# Altium PCB PCB.PcbDoc (part 4 of 8)
Units mm, origin at the board's own origin, x right, y up, seen from the top; angles counter-clockwise.
Board outline 78.8 x 69 mm, 12 copper layers (Top Layer, GND_12, uStrip1, GND_35, Clocks, GND_57, POWER, Slow_Ctrl, GND_810, uStrip2, GND_1012, Bottom Layer), stack 2.926 mm thick; 460 components, 314 nets, 1929 pads, 3409 vias.
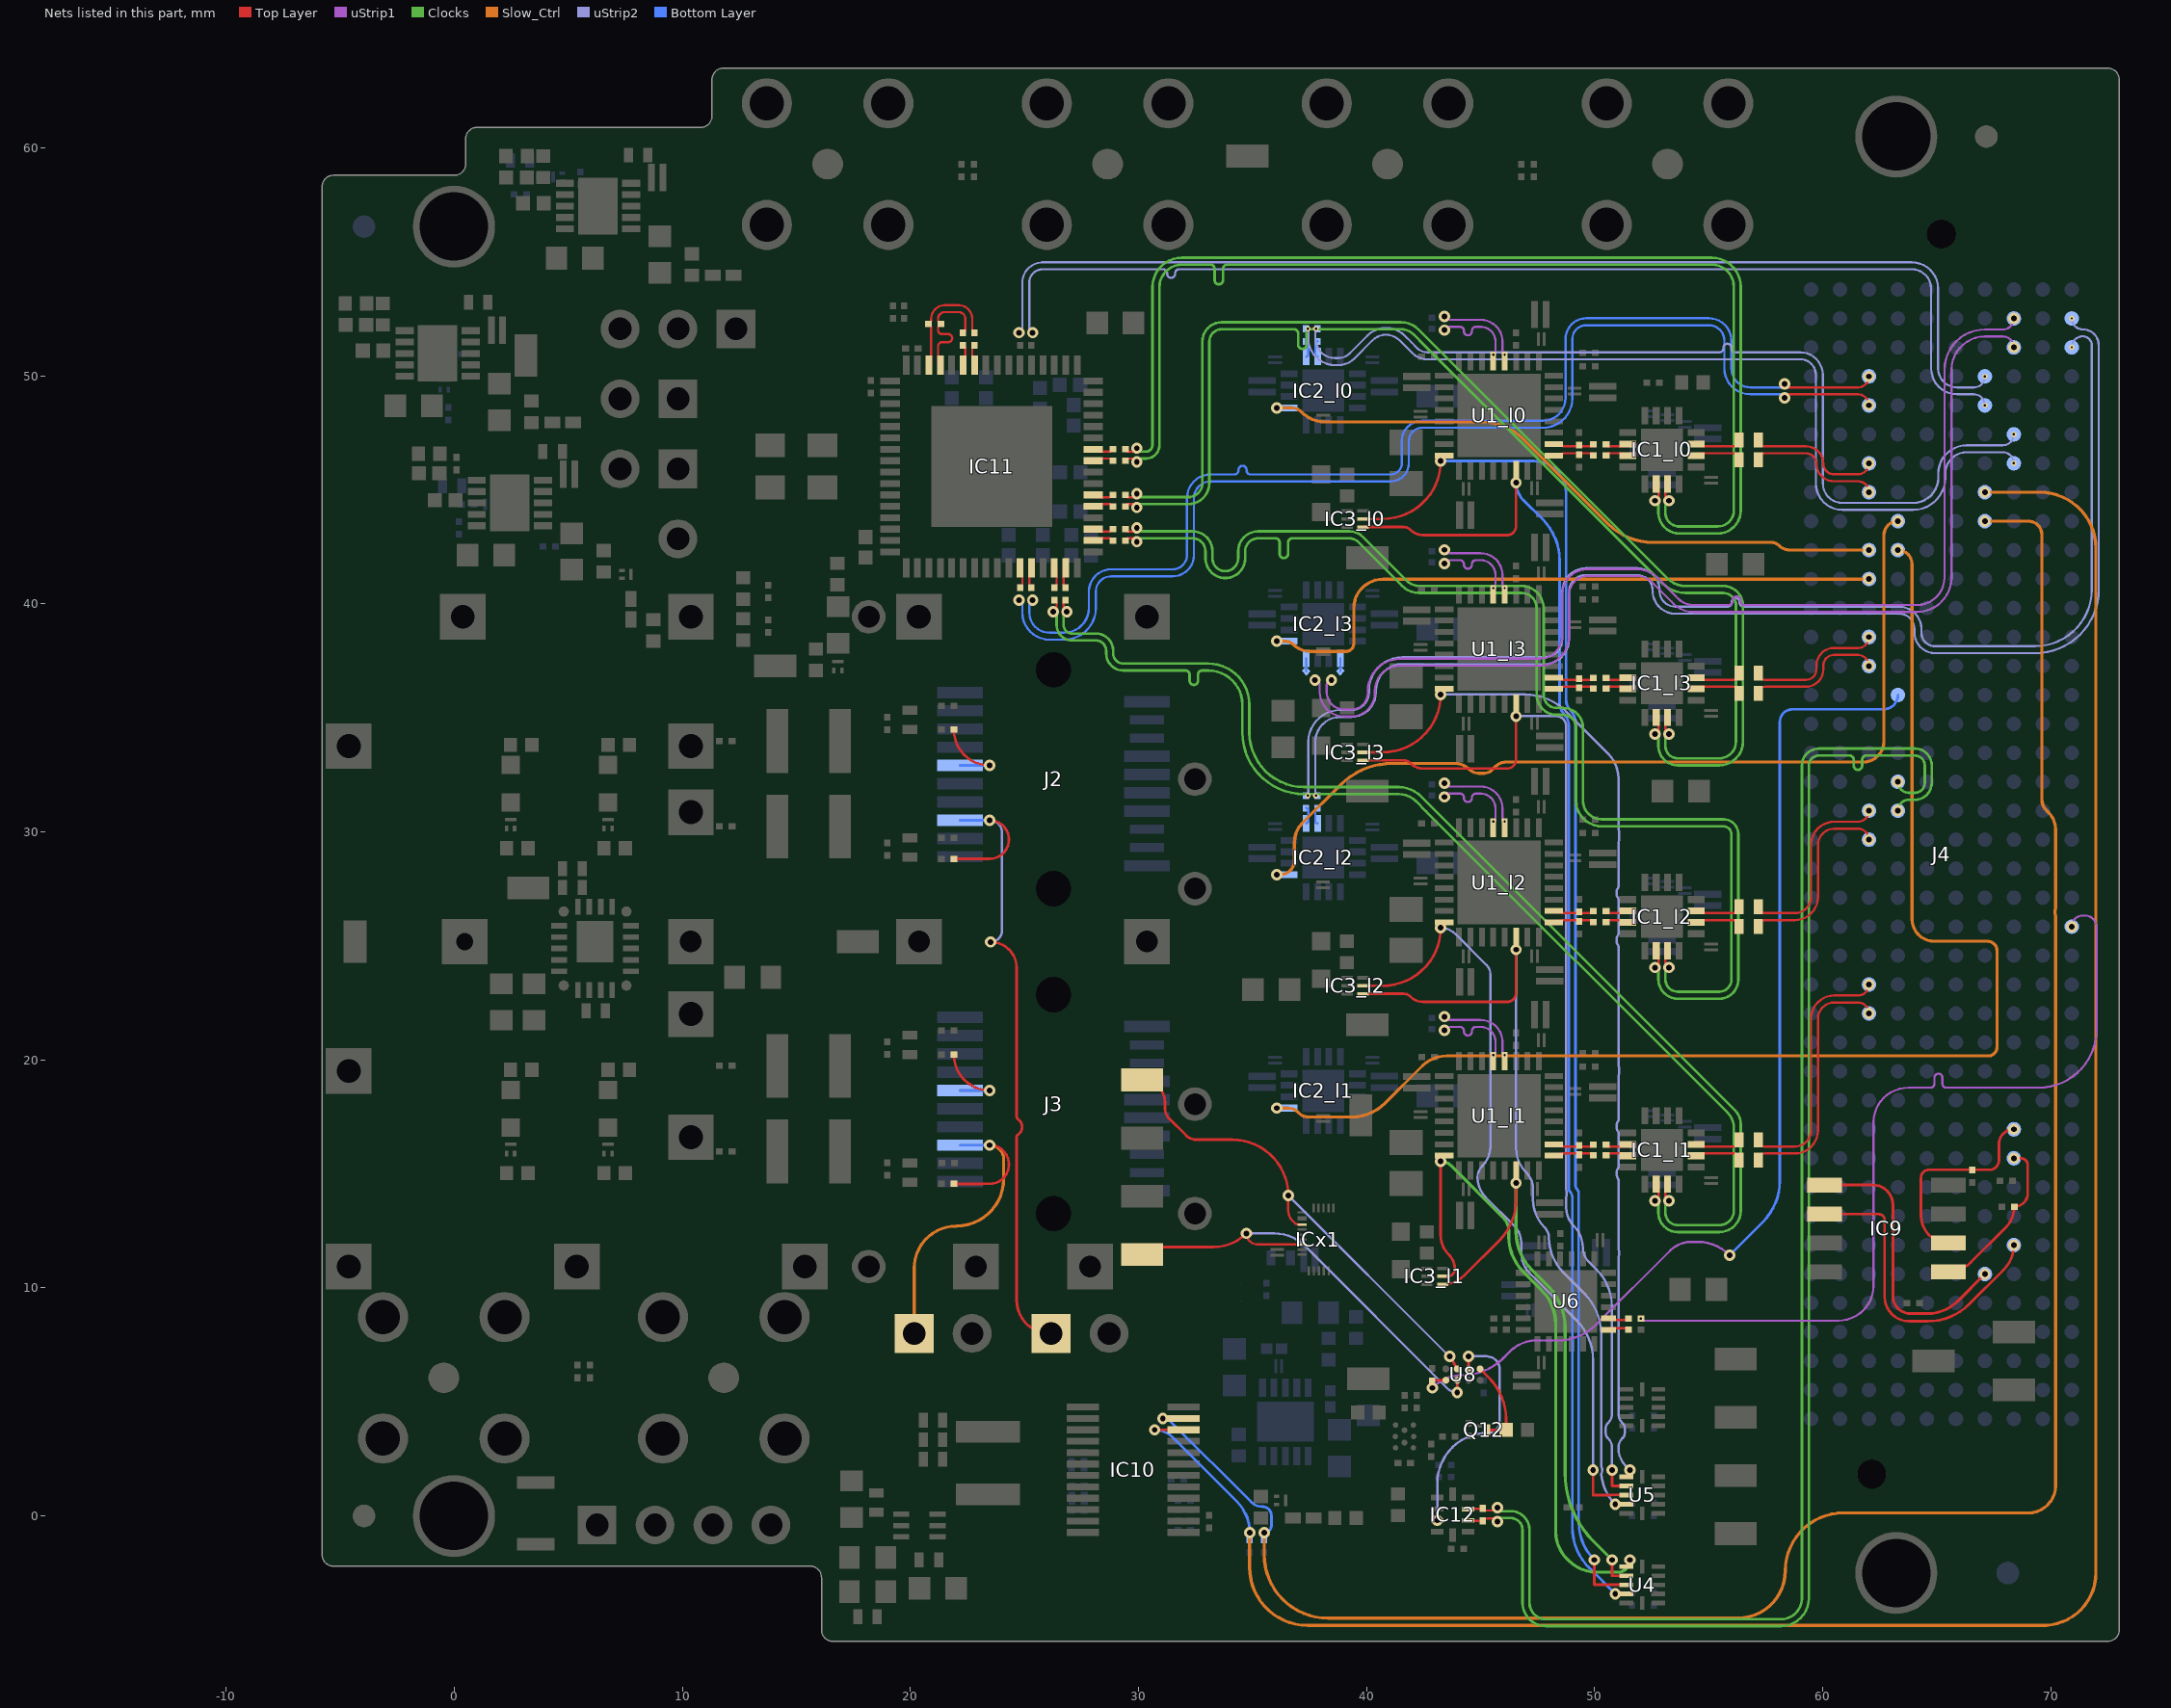
[diagram p13: the nets of this part, all layers, seen from the top]

## Via types
v1: diameter 0.25, hole 0.1, Top Layer to uStrip1, tented both sides, 1130 vias
v2: diameter 0.25, hole 0.1, uStrip2 to Bottom Layer, tented both sides, 686 vias
v3: diameter 0.5, hole 0.25, Top Layer to Bottom Layer, tented both sides, 674 vias
v4: diameter 0.5, hole 0.25, Top Layer to Bottom Layer, 632 vias
v5: diameter 0.5, hole 0.25, uStrip1 to uStrip2, tented both sides, 281 vias
v6: diameter 0.584, hole 0.483, Top Layer to Bottom Layer, tented both sides, 6 vias

## Nets (pads, with @x,y where several pads share a name; then routed paths per layer and width w, separated by ;. In a path a pad name is that pad's centre, name@x,y a point inside that pad or via, vN(x,y) a via of type N, cw(c..) or ccw(c..) an arc to the next point about the centre after c; other vN are vias at no path point) (continued)
*OE_SN74: Q12.3 R77.1 U8.1 | length 3.8
  Top Layer w0.117: U8.1@44.975,6.453 45.373,6.055 cw(c43.577,4.259) 46.117,4.259 R77.1@46.117,3.772 45.885,3.772 45.36,3.772 Q12.3@45.343,3.771
*RST_1V: ICx1.13 TP19.1 U8.3 | length 21.6
  Top Layer w0.102: v3(36.567,14.054) 36.567,13.381 ccw(c37.169,13.381) 36.749,12.95 36.863,12.839 ccw(c36.969,12.949) 36.954,12.797 37.112,12.782 ccw(c37.169,13.381) ICx1.13@37.169,12.779
  Top Layer w0.117: TP19.1@30.155,19.124 cw(c30.155,18.114) 31.166,18.114 31.166,17.859 ccw(c31.765,17.859) 31.341,17.436 32.087,16.69 ccw(c32.543,17.146) 32.543,16.502 34.119,16.502 cw(c34.119,14.054) v3(36.567,14.054) ; v3(43.651,7.005) U8.3@43.975,6.453
  uStrip2 w0.102: v3(36.567,14.054) 43.591,7.03 ccw(c43.651,7.091) v3(43.651,7.005)
*RST_PSF: J4.G15 R78.2 U8.5 | length 46.1
  Top Layer w0.117: R78.2@42.882,5.925 42.956,5.953 U8.5@43.475,5.953
  uStrip1 w0.102: v3(42.882,5.618) 42.912,5.648 cw(c44.184,4.376) 44.184,6.175 44.189,6.175 ccw(c44.189,8.715) 45.985,6.919 46.275,7.209 cw(c47.451,6.033) 47.451,7.696 48.365,7.696 ccw(c48.365,10.106) 50.07,8.402 53.307,11.639 cw(c54.235,10.712) 54.235,12.024 54.507,12.024 cw(c54.507,10.026) v3(55.919,11.438)
  Bottom Layer w0.117: v3(55.919,11.438) 57.373,12.892 ccw(c55.577,14.688) 58.117,14.688 58.117,34.821 cw(c58.679,34.821) 58.679,35.382 62.67,35.382 ccw(c62.67,36.01) J4.G15@63.298,36.01
ABS0: J2.6 R48.1 | length 3.8
  Top Layer w0.117: R48.1@21.904,34.487 21.904,34.482 ccw(c23.471,34.482) v3(23.471,32.915)
  Bottom Layer w0.117: J2.6@22.171,32.915 v3(23.471,32.915)
ABS1: J3.6 R56.1 | length 3.8
  Top Layer w0.117: R56.1@21.904,20.237 21.904,20.232 ccw(c23.471,20.232) v3(23.471,18.665)
  Bottom Layer w0.117: J3.6@22.171,18.665 v3(23.471,18.665)
ADJ_SCL: IC10.22 J4.D8 R63.1 | length 100.7
  Top Layer w0.117: v3@30.608,3.777 v3(30.708,3.777) IC10.22@31.978,3.777
  Slow_Ctrl w0.137: v3(34.881,-0.738) 34.872,-0.747 34.872,-2.258 ccw(c37.412,-2.258) 37.412,-4.798 69.673,-4.798 ccw(c69.673,-2.493) 69.808,-4.794 ccw(c69.673,-2.493) 71.978,-2.493 71.978,42.441 ccw(c69.52,42.441) 69.52,44.9 v3(67.108,44.9)
  Bottom Layer w0.117: v3(30.708,3.777) cw(c30.708,2.653) 31.503,3.448 34.31,0.641 cw(c32.932,-0.738) v3(34.881,-0.738) 34.876,-0.742 34.876,-1.039 R63.1@34.872,-1.044
ADJ_SDA: IC10.23 J4.D9 R62.1 | length 92.8
  Slow_Ctrl w0.137: v3@35.507,-0.732 35.507,-1.686 ccw(c38.301,-1.686) 38.301,-4.48 56.285,-4.48 ccw(c56.285,-2.407) 58.357,-2.407 cw(c60.897,-2.407) 60.897,0.133 69.01,0.133 ccw(c69.01,1.334) 70.211,1.334 70.211,26.3 ccw(c70.074,26.3) 70.203,26.347 cw(c70.599,26.488) 70.203,26.63 ccw(c70.074,26.676) 70.211,26.676 70.211,30.089 ccw(c69.117,30.089) 70.107,30.555 ccw(c69.117,30.089) 69.891,30.863 69.809,30.945 cw(c70.299,31.434) 69.607,31.434 69.607,43.034 ccw(c69.01,43.034) 69.01,43.63 v3(67.108,43.63)
  Bottom Layer w0.117: v3(31.065,4.277) cw(c31.065,3.771) 31.327,4.204 cw(c31.065,3.771) 31.422,4.129 34.935,0.616 ccw(c35.434,1.114) 35.434,0.409 cw(c35.434,0.015) 35.828,0.015 35.828,-0.411 cw(c35.508,-0.411) v3(35.508,-0.731)
BEAT_0_N: C24_l0.1 J4.H8 | length 6
  Top Layer w0.099: C24_l0.1@57.181,46.321 cw(c57.467,46.321) 57.467,46.607 59.264,46.607 cw(c59.264,46.147) 59.724,46.147 ccw(c60.489,46.147) 60.489,45.383 61.545,45.383 cw(c61.545,44.9) v3(62.028,44.9)
BEAT_0_P: C12_l0.1 J4.H7 | length 6
  Top Layer w0.099: C12_l0.1@57.181,47.198 ccw(c57.467,47.198) 57.467,46.912 59.264,46.912 cw(c59.264,46.147) 60.029,46.147 ccw(c60.489,46.147) 60.489,45.687 61.545,45.687 ccw(c61.545,46.17) v3(62.028,46.17)
BEAT_1_N: C24_l1.1 J4.H26 | length 11.2
  Top Layer w0.099: C24_l1.1@57.181,15.612 cw(c57.467,15.612) 57.467,15.898 58.775,15.898 ccw(c58.775,16.915) 59.793,16.915 59.793,21.81 cw(c60.506,21.81) 60.506,22.523 61.545,22.523 cw(c61.545,22.04) v3(62.028,22.04)
BEAT_1_P: C12_l1.1 J4.H25 | length 11.2
  Top Layer w0.099: C12_l1.1@57.181,16.488 ccw(c57.467,16.488) 57.467,16.202 58.775,16.202 ccw(c58.775,16.915) 59.488,16.915 59.488,21.81 cw(c60.506,21.81) 60.506,22.827 61.545,22.827 ccw(c61.545,23.31) v3(62.028,23.31)
BEAT_2_N: C24_l2.1 J4.H20 | length 8.6
  Top Layer w0.099: C24_l2.1@57.181,25.848 cw(c57.467,25.848) 57.467,26.134 58.775,26.134 ccw(c58.775,27.152) 59.793,27.152 59.793,29.43 cw(c60.506,29.43) 60.506,30.143 61.545,30.143 cw(c61.545,29.66) v3(62.028,29.66)
BEAT_2_P: C12_l2.1 J4.H19 | length 8.6
  Top Layer w0.099: C12_l2.1@57.181,26.725 ccw(c57.467,26.725) 57.467,26.439 58.775,26.439 ccw(c58.775,27.152) 59.488,27.152 59.488,29.43 cw(c60.506,29.43) 60.506,30.447 61.545,30.447 ccw(c61.545,30.93) v3(62.028,30.93)
BEAT_3_N: C24_l3.1 J4.H14 | length 6.2
  Top Layer w0.099: C24_l3.1@57.181,36.085 cw(c57.467,36.085) 57.467,36.37 59.264,36.37 ccw(c59.264,37.135) 60.029,37.135 60.029,37.303 cw(c60.489,37.303) 60.489,37.763 61.545,37.763 cw(c61.545,37.28) v3(62.028,37.28)
BEAT_3_P: C12_l3.1 J4.H13 | length 6.2
  Top Layer w0.099: C12_l3.1@57.181,36.961 ccw(c57.467,36.961) 57.467,36.675 59.264,36.675 ccw(c59.264,37.135) 59.724,37.135 59.724,37.303 cw(c60.489,37.303) 60.489,38.067 61.545,38.067 ccw(c61.545,38.55) v3(62.028,38.55)
BEAT_l0_N: C24_l0.2 IC1_l0.10 | length 2.1
  Top Layer w0.099: IC1_l0.10@54.449,46.509 cw(c54.685,46.274) 54.685,46.607 56.122,46.607 ccw(c56.147,46.632) 56.147,46.597 cw(c56.147,46.517) 56.204,46.573 56.243,46.534 cw(c56.029,46.321) C24_l0.2@56.331,46.321
BEAT_l0_P: C12_l0.2 IC1_l0.11 | length 2.1
  Top Layer w0.099: IC1_l0.11@54.449,47.009 ccw(c54.685,47.245) 54.685,46.912 56.108,46.912 ccw(c56.108,46.947) 56.133,46.922 56.147,46.922 ccw(c56.147,47.002) 56.204,46.945 56.243,46.984 ccw(c56.029,47.198) C12_l0.2@56.331,47.198
BEAT_l1_N: C24_l1.2 IC1_l1.10 | length 2.1
  Top Layer w0.099: IC1_l1.10@54.449,15.8 cw(c54.685,15.564) 54.685,15.898 56.122,15.898 ccw(c56.147,15.923) 56.147,15.887 cw(c56.147,15.808) 56.204,15.864 56.243,15.825 cw(c56.029,15.612) C24_l1.2@56.331,15.612
BEAT_l1_P: C12_l1.2 IC1_l1.11 | length 2.1
  Top Layer w0.099: IC1_l1.11@54.449,16.3 ccw(c54.685,16.536) 54.685,16.202 56.108,16.202 ccw(c56.108,16.238) 56.133,16.213 56.147,16.213 ccw(c56.147,16.293) C12_l1.2@56.204,16.236 ; C12_l1.2@56.204,16.236 56.243,16.275 ccw(c56.029,16.488) C12_l1.2@56.331,16.488
BEAT_l2_N: C24_l2.2 IC1_l2.10 | length 2.1
  Top Layer w0.099: IC1_l2.10@54.449,26.036 cw(c54.685,25.801) 54.685,26.134 56.122,26.134 ccw(c56.147,26.159) 56.147,26.124 cw(c56.147,26.044) 56.204,26.1 56.243,26.062 cw(c56.029,25.848) C24_l2.2@56.331,25.848
BEAT_l2_P: C12_l2.2 IC1_l2.11 | length 2.1
  Top Layer w0.099: IC1_l2.11@54.449,26.536 ccw(c54.685,26.772) 54.685,26.439 56.108,26.439 ccw(c56.108,26.474) 56.133,26.449 56.147,26.449 ccw(c56.147,26.529) 56.204,26.473 56.243,26.511 ccw(c56.029,26.725) C12_l2.2@56.331,26.725
BEAT_l3_N: C24_l3.2 IC1_l3.10 | length 2.1
  Top Layer w0.099: IC1_l3.10@54.449,36.273 cw(c54.685,36.037) 54.685,36.37 56.122,36.37 ccw(c56.147,36.395) 56.147,36.36 cw(c56.147,36.28) 56.204,36.337 56.243,36.298 cw(c56.029,36.085) C24_l3.2@56.331,36.085
BEAT_l3_P: C12_l3.2 IC1_l3.11 | length 2.1
  Top Layer w0.099: IC1_l3.11@54.449,36.773 ccw(c54.685,37.009) 54.685,36.675 56.108,36.675 ccw(c56.108,36.711) 56.133,36.686 56.147,36.686 ccw(c56.147,36.765) 56.204,36.709 56.243,36.748 ccw(c56.029,36.961) C12_l3.2@56.331,36.961
CDR_LOL_0: IC3_l0.2 U1_l0.16 U4.9 | length 60.8
  Top Layer w0.117: IC3_l0.2@39.84,43.726 39.844,43.73 40.711,43.73 ccw(c40.711,46.266) v3(43.247,46.266) ; v3(49.986,-1.924) 49.986,-3.019 50.721,-3.019 50.731,-3.009 51.379,-3.009 U4.9@51.389,-3.019
  Bottom Layer w0.117: v3(43.247,46.266) 47.333,46.266 cw(c47.333,44.85) 48.749,44.85 48.749,35.794 ccw(c49.432,35.794) 48.949,35.311 cw(c48.43,34.792) 49.164,34.792 49.164,14.462 ccw(c49.3,14.462) 49.204,14.366 cw(c48.97,14.132) 49.301,14.132 49.301,-0.27 ccw(c51.641,-0.27) v3(49.986,-1.924)
CDR_LOL_1: IC3_l1.2 U1_l1.16 U4.7 | length 28.4
  Top Layer w0.117: v3(43.247,15.557) 43.247,12.331 ccw(c44.491,12.331) 43.611,11.451 cw(c42.995,10.835) 43.866,10.835 43.866,10.815 cw(c43.563,10.815) 43.563,10.512 IC3_l1.2@43.34,10.512
  Clocks w0.137: v3(43.247,15.557) cw(c43.247,14.92) 43.501,15.504 cw(c43.247,14.92) 43.697,15.371 46.005,13.062 cw(c45.453,12.511) 46.234,12.511 46.234,12.26 ccw(c48.452,12.26) 46.883,10.691 47.679,9.896 cw(c46.195,8.412) 48.293,8.412 48.293,-0.685 ccw(c50.002,-0.685) 48.849,-1.946 ccw(c50.11,-0.681) 50.11,-2.467 51.002,-2.467 ccw(c51.002,-1.924) v3(51.545,-1.924)
CDR_LOL_2: IC3_l2.2 U1_l2.16 U5.9 | length 34.3
  Top Layer w0.117: IC3_l2.2@39.84,23.253 39.844,23.257 40.711,23.257 ccw(c40.711,25.793) v3(43.247,25.793) ; v3(49.93,2.012) 49.93,0.918 50.721,0.918 50.731,0.928 51.379,0.928 U5.9@51.389,0.918
  uStrip2 w0.102: v3(43.247,25.793) cw(c43.247,24.872) 43.898,25.523 45.263,24.159 cw(c44.866,23.762) 45.427,23.762 45.427,16.204 cw(c44.207,16.204) 45.07,15.341 ccw(c45.569,14.842) 44.863,14.842 ccw(c46.076,14.842) 45.218,13.984 46.483,12.719 cw(c45.764,12) 46.781,12 46.781,11.543 ccw(c48.052,11.543) 47.153,10.644 49.186,8.611 cw(c47.39,6.815) 49.93,6.815 v3(49.93,2.012)
CDR_LOL_3: IC3_l3.2 U1_l3.16 U5.7 | length 45.1
  Top Layer w0.117: IC3_l3.2@39.84,33.49 39.844,33.494 40.711,33.494 ccw(c40.711,36.03) v3(43.247,36.03)
  uStrip2 w0.102: v3(43.247,36.03) 46.947,36.03 cw(c46.947,33.49) 48.743,35.286 50.58,33.449 cw(c49.46,32.329) 51.044,32.329 51.044,30.417 51.075,29.718 cw(c50.673,29.698) 51.069,29.63 cw(c50.673,29.698) 51.05,29.558 ccw(c51.146,29.523) 51.044,29.524 51.044,27.622 cw(c50.907,27.623) 51.023,27.55 ccw(c51.378,27.324) 51.023,27.099 cw(c50.907,27.026) 51.044,27.027 51.044,25.555 cw(c50.907,25.555) 51.023,25.483 ccw(c51.378,25.257) 51.023,25.032 cw(c50.907,24.959) 51.044,24.96 51.044,19.887 51.074,19.493 cw(c50.673,19.462) 51.069,19.393 cw(c50.673,19.462) 51.05,19.322 ccw(c51.146,19.287) 51.044,19.288 51.044,17.385 cw(c50.907,17.386) 51.023,17.314 ccw(c51.378,17.088) 51.023,16.863 cw(c50.907,16.79) 51.044,16.791 51.044,15.319 cw(c50.907,15.319) 51.023,15.246 ccw(c51.378,15.021) 51.007,14.823 51.028,14.784 cw(c50.907,14.719) 51.044,14.719 51.044,11.778 51.048,11.745 51.07,11.55 cw(c50.671,11.503) 51.055,11.384 cw(c50.671,11.503) 51.05,11.367 ccw(c51.146,11.334) 51.047,11.359 ccw(c51.146,11.334) 51.044,11.334 51.044,4.481 ccw(c51.599,4.481) 51.206,4.089 51.232,4.063 cw(c51.026,3.857) 51.31,3.921 cw(c51.026,3.857) 51.317,3.857 51.317,3.63 cw(c51.026,3.63) 51.31,3.567 cw(c51.026,3.63) 51.232,3.424 51.206,3.398 ccw(c51.599,3.006) 51.044,3.006 ; 51.044,2.976 ccw(c52.162,2.976) 51.371,2.185 v3(51.545,2.012)
CDR_LOS_0: IC3_l0.1 U1_l0.22 U4.10 | length 59.1
  Top Layer w0.117: IC3_l0.1@39.84,43.376 41.62,43.376 cw(c41.62,42.946) 41.924,43.25 ccw(c42.487,43.813) 42.487,43.017 46.154,43.017 ccw(c46.154,43.416) 46.553,43.416 v3(46.553,45.314)
  Bottom Layer w0.117: v3(46.553,45.314) ccw(c47.606,45.314) 46.862,44.57 47.72,43.711 cw(c45.924,41.915) 48.464,41.915 48.464,35.642 ccw(c49.15,35.642) 48.665,35.157 cw(c48.193,34.685) 48.86,34.685 48.86,14.366 ccw(c49.07,14.366) 48.922,14.218 cw(c48.684,13.981) 49.02,13.981 49.02,-0.485 ccw(c51.56,-0.485) 49.606,-2.108 49.671,-2.186 ccw(c49.986,-1.924) 49.697,-2.215 49.764,-2.281 v3(50.901,-3.419)
CDR_LOS_1: IC3_l1.1 U1_l1.22 U4.8 | length 25.1
  Top Layer w0.117: IC3_l1.1@43.34,10.162 ccw(c43.34,11.502) 44.288,10.555 45.809,12.077 ccw(c44.013,13.873) 46.553,13.873 v3(46.553,14.605) ; v3(50.766,-1.924) 50.766,-2.619 U4.8@51.389,-2.619
  Clocks w0.137: v3(46.553,14.605) 46.553,12.483 ccw(c48.971,12.483) 47.262,10.774 47.959,10.076 cw(c46.163,8.28) 48.703,8.28 48.703,1.876 ; 48.703,1.876 ccw(c52.897,1.876) 49.932,-1.09 49.933,-1.091 v3(50.766,-1.924)
CDR_LOS_2: IC3_l2.1 U1_l2.22 U5.10 | length 34.6
  Top Layer w0.117: IC3_l2.1@39.84,22.903 41.62,22.903 cw(c41.62,22.474) 41.924,22.777 ccw(c42.487,23.34) 42.487,22.544 46.154,22.544 ccw(c46.154,22.943) 46.553,22.943 v3(46.553,24.841)
  uStrip2 w0.102: v3(46.553,24.841) 46.553,16.131 ccw(c48.029,16.131) 46.986,15.087 cw(c46.234,14.335) 47.297,14.335 47.297,13.889 ccw(c49.049,13.889) 47.81,12.65 cw(c47.368,12.208) 47.993,12.208 ccw(c50.154,12.208) 48.626,10.68 49.54,9.767 cw(c47.743,7.971) 50.283,7.971 50.283,2.228 ccw(c50.385,2.229) 50.293,2.186 cw(c49.93,2.012) 50.301,1.854 ccw(c50.394,1.816) 50.293,1.807 ccw(c52.393,2.009) v3(50.901,0.518)
CDR_LOS_3: IC3_l3.1 U1_l3.22 U5.8 | length 46.1
  Top Layer w0.117: IC3_l3.1@39.84,33.14 41.62,33.14 cw(c41.62,32.71) 41.924,33.014 ccw(c42.487,33.577) 42.487,32.781 46.154,32.781 ccw(c46.154,33.18) 46.553,33.18 v3(46.553,35.078) ; v3(50.766,2.012) 50.766,1.318 U5.8@51.389,1.318
  uStrip2 w0.102: v3(46.553,35.078) 48.313,35.078 cw(c48.313,34.64) 48.75,34.64 48.75,14.451 ; 48.75,14.45 48.764,14.106 cw(c48.362,14.087) 48.753,13.991 ccw(c48.852,13.967) 48.75,13.968 48.75,13.527 ccw(c49.891,13.527) 49.084,12.72 cw(c48.124,11.759) 49.482,11.759 ccw(c50.33,11.759) 49.731,11.16 50.072,10.818 cw(c48.41,9.157) 50.76,9.157 50.76,4.481 cw(c50.205,4.481) 50.598,4.089 50.572,4.063 ccw(c50.778,3.857) 50.494,3.921 ccw(c50.778,3.857) 50.487,3.857 50.487,3.63 ccw(c50.778,3.63) 50.494,3.567 ccw(c50.778,3.63) 50.572,3.424 50.598,3.398 cw(c50.205,3.006) 50.76,3.006 50.76,2.018 v3(50.766,2.012)
CLK40: IC12.8 U8.2 | length 10.4
  Top Layer w0.117: U8.2@44.475,6.453 v5(44.475,7.005)
  uStrip2 w0.102: v5(43.1,-0.192) 43.1,1.425 cw(c45.33,1.425) 45.33,3.654 ccw(c45.33,4.158) 45.834,4.158 45.834,6.432 ccw(c45.261,6.432) 45.261,7.005 v5(44.475,7.005)
  other v1: 43.1,-0.192 44.475,7.005
CLK40_1V: ICx1.17 TP13.1 U8.6 | length 20.1
  Top Layer w0.102: v3(34.731,12.395) ccw(c35.212,12.395) 35.212,11.915 35.453,11.915 ICx1.17@37.169,11.903 ; v3(43.975,5.416) U8.6@43.975,5.953
  Top Layer w0.117: TP13.1@30.142,11.797 33.287,11.797 ccw(c33.287,13.84) v3(34.731,12.395)
  uStrip2 w0.102: v3(34.731,12.395) 35.943,12.395 cw(c35.943,10.468) 37.306,11.831 43.541,5.595 ccw(c43.975,6.029) v3(43.975,5.416) v3@43.918,5.472
CLK40_N: IC12.3 J4.G19 R75.1 | length 65
  Top Layer w0.099: IC12.3@44.45,0.308 45.058,0.308 ccw(c45.058,0.337) R75.1@45.087,0.337 45.087,0.326 ccw(c45.298,0.538) 45.298,0.239 v3@45.639,0.239
  Clocks w0.114: v3@45.892,0.214 46.318,0.214 cw(c46.318,-0.608) 47.14,-0.608 47.14,-3.803 ccw(c47.866,-3.803) 47.866,-4.529 58.167,-4.529 ccw(c58.167,-3.612) 59.084,-3.612 59.084,32.908 cw(c59.833,32.908) 59.833,33.656 64.043,33.656 cw(c64.043,32.923) 64.776,32.923 64.776,32.146 cw(c64.043,32.146) 64.043,31.413 63.78,31.413 ccw(c63.78,30.93) v3(63.298,30.93)
  other v3: 45.744,0.362
CLK40_P: IC12.2 J4.G18 R75.2 | length 65
  Top Layer w0.099: IC12.2@44.45,-0.192 ccw(c44.472,-0.192) 44.472,-0.213 R75.2@45.087,-0.213 45.087,-0.203 cw(c45.298,-0.415) 45.298,-0.116 v3@45.639,-0.116
  Clocks w0.114: v3@45.892,-0.091 46.318,-0.091 cw(c46.318,-0.608) 46.836,-0.608 46.836,-3.803 ccw(c47.866,-3.803) 47.866,-4.834 58.167,-4.834 ccw(c58.167,-3.612) 59.389,-3.612 59.389,32.908 cw(c59.833,32.908) 59.833,33.351 60.749,33.351 61.174,33.351 cw(c61.174,33.167) 61.358,33.167 61.358,32.909 ccw(c61.542,32.909) 61.726,32.909 61.726,33.167 cw(c61.911,33.167) 61.911,33.351 62.33,33.351 64.043,33.351 cw(c64.043,32.923) 64.472,32.923 64.472,32.146 cw(c64.043,32.146) 64.043,31.717 63.78,31.717 cw(c63.78,32.2) v3(63.298,32.2)
  other v3: 45.744,-0.239
CLN_RXUSRCLK_N: C98.2 J4.D5 | length 49.9
  uStrip2 w0.094: v1(25.359,51.898) cw(c25.359,52.047) 25.211,52.047 25.211,54.095 cw(c25.792,54.095) 25.792,54.676 30.686,54.676 31.081,54.676 cw(c31.081,54.502) 31.255,54.502 31.255,54.474 ccw(c31.429,54.474) 31.603,54.474 31.603,54.502 cw(c31.777,54.502) 31.777,54.676 32.195,54.676 63.909,54.676 cw(c63.909,53.832) 64.754,53.832 64.754,50.328 ccw(c65.889,50.328) 65.889,49.193 66.625,49.193 cw(c66.625,48.71) v2(67.108,48.71)
  other v5: 25.359,51.898
CLN_RXUSRCLK_P: C97.2 J4.D4 | length 49.9
  uStrip2 w0.094: v1(24.758,51.898) ccw(c24.758,52.047) 24.906,52.047 24.906,54.126 24.908,54.157 cw(c25.792,54.095) 25.73,54.979 25.761,54.981 63.909,54.981 cw(c63.909,53.832) 65.058,53.832 65.058,50.328 ccw(c65.889,50.328) 65.889,49.497 66.625,49.497 ccw(c66.625,49.98) v2(67.108,49.98)
  other v5: 24.758,51.898
CLOCK_OUT_C_l0_N: C18_l0.2 IC1_l0.3 | length 1.1
  Top Layer w0.099: C18_l0.2@50.499,46.519 cw(c50.587,46.519) 50.587,46.607 51.351,46.607 cw(c51.351,46.509) IC1_l0.3@51.449,46.509
CLOCK_OUT_C_l0_P: C13_l0.2 IC1_l0.2 | length 1.1
  Top Layer w0.099: C13_l0.2@50.499,47 ccw(c50.587,47) 50.587,46.912 51.351,46.912 ccw(c51.351,47.009) IC1_l0.2@51.449,47.009
CLOCK_OUT_C_l1_N: C18_l1.2 IC1_l1.3 | length 1.1
  Top Layer w0.099: C18_l1.2@50.499,15.81 cw(c50.587,15.81) 50.587,15.898 51.351,15.898 cw(c51.351,15.8) IC1_l1.3@51.449,15.8
CLOCK_OUT_C_l1_P: C13_l1.2 IC1_l1.2 | length 1.1
  Top Layer w0.099: C13_l1.2@50.499,16.29 ccw(c50.587,16.29) 50.587,16.202 51.351,16.202 ccw(c51.351,16.3) IC1_l1.2@51.449,16.3
CLOCK_OUT_C_l2_N: C18_l2.2 IC1_l2.3 | length 1.1
  Top Layer w0.099: C18_l2.2@50.499,26.046 cw(c50.587,26.046) 50.587,26.134 51.351,26.134 cw(c51.351,26.036) IC1_l2.3@51.449,26.036
CLOCK_OUT_C_l2_P: C13_l2.2 IC1_l2.2 | length 1.1
  Top Layer w0.099: C13_l2.2@50.499,26.527 ccw(c50.587,26.527) 50.587,26.439 51.351,26.439 ccw(c51.351,26.536) IC1_l2.2@51.449,26.536
CLOCK_OUT_C_l3_N: C18_l3.2 IC1_l3.3 | length 1.1
  Top Layer w0.099: C18_l3.2@50.499,36.283 cw(c50.587,36.283) 50.587,36.37 51.351,36.37 cw(c51.351,36.273) IC1_l3.3@51.449,36.273
CLOCK_OUT_C_l3_P: C13_l3.2 IC1_l3.2 | length 1.1
  Top Layer w0.099: C13_l3.2@50.499,36.763 ccw(c50.587,36.763) 50.587,36.675 51.351,36.675 ccw(c51.351,36.773) IC1_l3.2@51.449,36.773
CLOCK_OUT_l0_N: C18_l0.1 R2_l0.1 U1_l0.25 | length 1.9
  Top Layer w0.099: U1_l0.25@48.204,46.509 cw(c48.391,46.322) 48.391,46.587 48.584,46.587 ccw(c48.584,46.621) 48.609,46.597 cw(c48.633,46.573) 48.633,46.607 49.195,46.607 cw(c49.195,46.42) R2_l0.1@49.327,46.552 cw(c49.382,46.552) 49.382,46.607 49.861,46.607 cw(c49.861,46.519) C18_l0.1@49.949,46.519
CLOCK_OUT_l0_P: C13_l0.1 R1_l0.1 U1_l0.26 | length 1.9
  Top Layer w0.099: U1_l0.26@48.204,47.009 ccw(c48.391,47.196) 48.391,46.932 48.584,46.932 cw(c48.584,46.897) 48.609,46.922 ccw(c48.633,46.946) 48.633,46.912 49.195,46.912 ccw(c49.195,47.099) R1_l0.1@49.327,46.966 ccw(c49.382,46.966) 49.382,46.912 49.861,46.912 ccw(c49.861,47) C13_l0.1@49.949,47
CLOCK_OUT_l1_N: C18_l1.1 R2_l1.1 U1_l1.25 | length 1.9
  Top Layer w0.099: U1_l1.25@48.204,15.8 cw(c48.391,15.613) 48.391,15.878 48.584,15.878 ccw(c48.584,15.912) 48.609,15.888 cw(c48.633,15.863) 48.633,15.898 49.195,15.898 cw(c49.195,15.711) R2_l1.1@49.327,15.843 cw(c49.382,15.843) 49.382,15.898 49.861,15.898 cw(c49.861,15.81) C18_l1.1@49.949,15.81
CLOCK_OUT_l1_P: C13_l1.1 R1_l1.1 U1_l1.26 | length 1.9
  Top Layer w0.099: U1_l1.26@48.204,16.3 ccw(c48.391,16.487) 48.391,16.223 48.584,16.223 cw(c48.584,16.188) 48.609,16.213 ccw(c48.633,16.237) 48.633,16.202 49.195,16.202 ccw(c49.195,16.39) R1_l1.1@49.327,16.257 ccw(c49.382,16.257) 49.382,16.202 49.861,16.202 ccw(c49.861,16.29) C13_l1.1@49.949,16.29
CLOCK_OUT_l2_N: C18_l2.1 R2_l2.1 U1_l2.25 | length 1.9
  Top Layer w0.099: U1_l2.25@48.204,26.036 cw(c48.391,25.849) 48.391,26.114 48.584,26.114 ccw(c48.584,26.148) 48.609,26.124 cw(c48.633,26.1) 48.633,26.134 49.195,26.134 cw(c49.195,25.947) R2_l2.1@49.327,26.079 cw(c49.382,26.079) 49.382,26.134 49.861,26.134 cw(c49.861,26.046) C18_l2.1@49.949,26.046
CLOCK_OUT_l2_P: C13_l2.1 R1_l2.1 U1_l2.26 | length 1.9
  Top Layer w0.099: U1_l2.26@48.204,26.536 ccw(c48.391,26.724) 48.391,26.459 48.584,26.459 cw(c48.584,26.425) 48.609,26.449 ccw(c48.633,26.473) 48.633,26.439 49.195,26.439 ccw(c49.195,26.626) R1_l2.1@49.327,26.494 ccw(c49.382,26.494) 49.382,26.439 49.861,26.439 ccw(c49.861,26.527) C13_l2.1@49.949,26.527
CLOCK_OUT_l3_N: C18_l3.1 R2_l3.1 U1_l3.25 | length 1.9
  Top Layer w0.099: U1_l3.25@48.204,36.273 cw(c48.391,36.086) 48.391,36.35 48.584,36.35 ccw(c48.584,36.385) 48.609,36.36 cw(c48.633,36.336) 48.633,36.37 49.195,36.37 cw(c49.195,36.183) R2_l3.1@49.327,36.316 cw(c49.382,36.316) 49.382,36.37 49.861,36.37 cw(c49.861,36.283) C18_l3.1@49.949,36.283
CLOCK_OUT_l3_P: C13_l3.1 R1_l3.1 U1_l3.26 | length 1.9
  Top Layer w0.099: U1_l3.26@48.204,36.773 ccw(c48.391,36.96) 48.391,36.695 48.584,36.695 cw(c48.584,36.661) 48.609,36.685 ccw(c48.633,36.71) 48.633,36.675 49.195,36.675 ccw(c49.195,36.862) R1_l3.1@49.327,36.73 ccw(c49.382,36.73) 49.382,36.675 49.861,36.675 ccw(c49.861,36.763) C13_l3.1@49.949,36.763
DATA_IN_C_l0_N: C29_l0.2 U1_l0.4 | length 3.8
  uStrip1 w0.094: v2(43.419,52.611) ccw(c43.567,52.611) 43.567,52.462 45.001,52.462 cw(c45.001,51.508) 45.956,51.508 45.956,51.028 ccw(c46.053,51.028) v1(46.053,50.93)
  other v5: 43.419,52.611
DATA_IN_C_l0_P: C30_l0.2 U1_l0.5 | length 3.8
  uStrip1 w0.094: v2(43.419,52.009) cw(c43.567,52.009) 43.567,52.158 43.7,52.158 44.095,52.158 cw(c44.095,51.984) 44.269,51.984 44.269,51.955 ccw(c44.443,51.955) 44.617,51.955 44.617,51.984 cw(c44.791,51.984) 44.791,52.158 45.001,52.158 cw(c45.001,51.508) 45.015,52.157 cw(c45.001,51.508) 45.651,51.508 45.651,51.028 cw(c45.553,51.028) v1(45.553,50.93)
  other v5: 43.419,52.009
DATA_IN_C_l1_N: C29_l1.2 U1_l1.4 | length 3.8
  uStrip1 w0.094: v2(43.419,21.902) ccw(c43.567,21.902) 43.567,21.753 45.001,21.753 cw(c45.001,20.799) 45.956,20.799 45.956,20.318 ccw(c46.053,20.318) v1(46.053,20.221)
  other v5: 43.419,21.902
DATA_IN_C_l1_P: C30_l1.2 U1_l1.5 | length 3.8
  uStrip1 w0.094: v2(43.419,21.3) cw(c43.567,21.3) 43.567,21.448 43.7,21.448 44.095,21.448 cw(c44.095,21.274) 44.269,21.274 44.269,21.246 ccw(c44.443,21.246) 44.617,21.246 44.617,21.274 cw(c44.791,21.274) 44.791,21.448 45.001,21.448 cw(c45.001,20.799) 45.015,21.448 cw(c45.001,20.799) 45.651,20.799 45.651,20.318 cw(c45.553,20.318) v1(45.553,20.221)
  other v5: 43.419,21.3
DATA_IN_C_l2_N: C29_l2.2 U1_l2.4 | length 3.8
  uStrip1 w0.094: v2(43.419,32.138) ccw(c43.567,32.138) 43.567,31.99 45.001,31.99 cw(c45.001,31.035) 45.956,31.035 45.956,30.555 ccw(c46.053,30.555) v1(46.053,30.457)
  other v5: 43.419,32.138
DATA_IN_C_l2_P: C30_l2.2 U1_l2.5 | length 3.8
  uStrip1 w0.094: v2(43.419,31.536) cw(c43.567,31.536) 43.567,31.685 43.7,31.685 44.095,31.685 cw(c44.095,31.511) 44.269,31.511 44.269,31.483 ccw(c44.443,31.483) 44.617,31.483 44.617,31.511 cw(c44.791,31.511) 44.791,31.685 45.001,31.685 cw(c45.001,31.035) 45.015,31.685 cw(c45.001,31.035) 45.651,31.035 45.651,30.555 cw(c45.553,30.555) v1(45.553,30.457)
  other v5: 43.419,31.536
DATA_IN_C_l3_N: C29_l3.2 U1_l3.4 | length 3.8
  uStrip1 w0.094: v2(43.419,42.374) ccw(c43.567,42.374) 43.567,42.226 45.001,42.226 cw(c45.001,41.272) 45.956,41.272 45.956,40.791 ccw(c46.053,40.791) v1(46.053,40.694)
  other v5: 43.419,42.374
DATA_IN_C_l3_P: C30_l3.2 U1_l3.5 | length 3.8
  uStrip1 w0.094: v2(43.419,41.773) cw(c43.567,41.773) 43.567,41.921 43.7,41.921 44.095,41.921 cw(c44.095,41.747) 44.269,41.747 44.269,41.719 ccw(c44.443,41.719) 44.617,41.719 44.617,41.747 cw(c44.791,41.747) 44.791,41.921 45.001,41.921 cw(c45.001,41.272) 45.015,41.921 cw(c45.001,41.272) 45.651,41.272 45.651,40.791 cw(c45.553,40.791) v1(45.553,40.694)
  other v5: 43.419,41.773
DDCLK0_N: C108.1 IC11.41 | length 1.1
  Top Layer w0.099: IC11.41@28.081,46.353 ccw(c28.081,46.28) IC11.41@28.008,46.28 cw(c28.106,46.28) 28.106,46.378 28.725,46.378 cw(c28.725,46.255) C108.1@28.848,46.255
DDCLK0_P: C106.1 IC11.42 | length 1.1
  Top Layer w0.099: IC11.42@28.081,46.707 cw(c28.081,46.78) IC11.42@28.008,46.78 ccw(c28.106,46.78) 28.106,46.683 28.725,46.683 ccw(c28.725,46.805) C106.1@28.848,46.805
DDCLK1_N: C110.1 IC11.37 | length 1.1
  Top Layer w0.099: IC11.37@28.081,44.353 ccw(c28.081,44.28) IC11.37@28.008,44.28 cw(c28.106,44.28) 28.106,44.378 28.725,44.378 cw(c28.725,44.255) C110.1@28.848,44.255
DDCLK1_P: C109.1 IC11.38 | length 1.1
  Top Layer w0.099: IC11.38@28.081,44.707 cw(c28.081,44.78) IC11.38@28.008,44.78 ccw(c28.106,44.78) 28.106,44.683 28.725,44.683 ccw(c28.725,44.805) C109.1@28.848,44.805
DDCLK2_N: C112.1 IC11.34 | length 1.1
  Top Layer w0.099: IC11.34@28.081,42.853 ccw(c28.081,42.78) IC11.34@28.008,42.78 cw(c28.106,42.78) 28.106,42.878 28.725,42.878 cw(c28.725,42.755) C112.1@28.848,42.755
DDCLK2_P: C111.1 IC11.35 | length 1.1
  Top Layer w0.099: IC11.35@28.081,43.207 cw(c28.081,43.28) IC11.35@28.008,43.28 ccw(c28.106,43.28) 28.106,43.183 28.725,43.183 ccw(c28.725,43.305) C111.1@28.848,43.305
DDCLK3_N: C114.1 IC11.30 | length 1
  Top Layer w0.099: C114.1@26.283,40.741 ccw(c26.283,40.863) 26.406,40.863 26.406,41.483 ccw(c26.308,41.483) IC11.30@26.308,41.58
DDCLK3_P: C113.1 IC11.31 | length 1
  Top Layer w0.099: IC11.31@26.808,41.58 ccw(c26.808,41.483) 26.711,41.483 26.711,40.863 ccw(c26.833,40.863) C113.1@26.833,40.741
DDCLK4_N: C120.1 IC11.27 | length 1
  Top Layer w0.099: C120.1@24.783,40.741 ccw(c24.783,40.863) 24.906,40.863 24.906,41.483 ccw(c24.808,41.483) IC11.27@24.808,41.58
DDCLK4_P: C119.1 IC11.28 | length 1
  Top Layer w0.099: IC11.28@25.308,41.58 ccw(c25.308,41.483) 25.211,41.483 25.211,40.863 ccw(c25.333,40.863) C119.1@25.333,40.741
DIS0: J2.3 R43.1 W1.1 | length 30.2
  Top Layer w0.117: R43.1@21.959,28.818 23.171,28.818 23.472,28.819 23.474,28.819 ccw(c23.472,29.667) 23.473,30.515 v3(23.471,30.515) ; v3(23.518,25.176) cw(c23.518,24.035) 24.66,24.035 24.66,17.504 ccw(c24.776,17.505) 24.712,17.408 cw(c24.487,17.065) 24.712,16.722 ccw(c24.776,16.625) 24.66,16.626 24.66,9.462 ccw(c26.119,9.462) W1.1@26.119,8.003
  uStrip2 w0.102: v3(23.471,30.515) cw(c23.471,29.971) 24.016,29.971 24.016,25.674 cw(c23.518,25.674) v3(23.518,25.176)
  Bottom Layer w0.117: J2.3@22.171,30.515 v3(23.471,30.515)
DIS1: J3.3 R51.1 W2.1 | length 16.3
  Top Layer w0.117: R51.1@21.959,14.568 23.171,14.568 23.472,14.569 23.474,14.569 ccw(c23.472,15.417) 23.473,16.265 v3(23.471,16.265)
  Slow_Ctrl w0.137: W2.1@20.164,8.007 20.164,10.862 cw(c22.02,10.862) 22.02,12.718 ccw(c22.02,14.785) 24.087,14.785 24.087,15.649 ccw(c23.471,15.649) v3(23.471,16.265)
  Bottom Layer w0.117: J3.3@22.171,16.265 v3(23.471,16.265)
DMTD_CLK_0_N: C108.2 IC1_l0.7 | length 51.7
  Top Layer w0.099: C108.2@29.426,46.281 cw(c29.524,46.281) 29.524,46.378 29.778,46.378 cw(c29.778,46.23) v3(29.926,46.23) ; IC1_l0.7@53.199,45.259 ccw(c53.435,45.024) 53.101,45.024 53.101,44.682 ccw(c53.256,44.682) v3(53.256,44.528)
  Clocks w0.114: v3(29.926,46.23) cw(c30.075,46.23) 30.075,46.378 30.332,46.378 ccw(c30.332,46.958) 30.912,46.958 30.912,47.356 30.912,53.883 cw(c31.912,53.883) 31.912,54.883 32.725,54.883 33.15,54.883 cw(c33.15,54.699) 33.334,54.699 33.334,54.204 ccw(c33.519,54.204) 33.703,54.204 33.703,54.699 cw(c33.887,54.699) 33.887,54.883 34.676,54.883 55.13,54.883 cw(c55.13,53.908) 56.104,53.908 56.104,44.108 cw(c55.391,44.108) 55.391,43.395 53.713,43.395 cw(c53.713,44.006) 53.101,44.006 53.101,44.374 cw(c53.256,44.374) v3(53.256,44.528)
DMTD_CLK_0_P: C106.2 IC1_l0.6 | length 51.7
  Top Layer w0.099: C106.2@29.426,46.78 ccw(c29.524,46.78) 29.524,46.683 29.778,46.683 ccw(c29.778,46.831) v3(29.926,46.831) ; v3(52.642,44.528) ccw(c52.642,44.682) 52.797,44.682 52.797,45.024 ccw(c52.463,45.024) IC1_l0.6@52.699,45.259
  Clocks w0.114: v3(29.926,46.831) ccw(c30.075,46.831) 30.075,46.683 30.332,46.683 ccw(c30.332,46.958) 30.608,46.958 30.608,47.229 30.608,53.883 cw(c31.912,53.883) 31.912,55.188 55.13,55.188 cw(c55.13,53.908) 56.409,53.908 56.409,44.108 cw(c55.391,44.108) 55.391,43.09 53.713,43.09 cw(c53.713,44.006) 52.797,44.006 52.797,44.374 ccw(c52.642,44.374) v3(52.642,44.528)
DMTD_CLK_1_N: C114.2 IC1_l1.7 | length 51.7
  Top Layer w0.099: v3(26.258,39.662) ccw(c26.258,39.811) 26.406,39.811 26.406,40.065 ccw(c26.309,40.065) C114.2@26.309,40.162 ; IC1_l1.7@53.199,14.55 ccw(c53.435,14.314) 53.101,14.314 53.101,13.973 ccw(c53.256,13.973) v3(53.256,13.819)
  Clocks w0.114: v3(26.258,39.662) cw(c26.258,39.514) 26.406,39.514 26.406,39.085 ccw(c27.093,39.085) 27.093,38.398 28.129,38.398 cw(c28.129,37.946) 28.581,37.946 28.581,37.838 ccw(c29.338,37.838) 29.338,37.081 31.481,37.081 32.057,37.081 cw(c32.057,36.897) 32.242,36.897 32.242,36.634 ccw(c32.426,36.634) 32.61,36.634 32.61,36.897 cw(c32.794,36.897) 32.794,37.081 32.851,37.081 33.055,37.081 cw(c33.055,35.583) 34.554,35.583 34.554,34.369 ccw(c37.261,34.369) 37.261,31.661 41.412,31.661 cw(c41.412,30.594) 42.166,31.349 42.614,30.9 55.831,17.684 cw(c55.17,17.024) 56.104,17.024 56.104,13.399 cw(c55.462,13.399) 55.462,12.756 53.642,12.756 cw(c53.642,13.297) 53.101,13.297 53.101,13.665 cw(c53.256,13.665) v3(53.256,13.819)
DMTD_CLK_1_P: C113.2 IC1_l1.6 | length 51.7
  Top Layer w0.099: C113.2@26.808,40.162 ccw(c26.808,40.065) 26.711,40.065 26.711,39.811 ccw(c26.859,39.811) v3(26.859,39.662) ; v3(52.642,13.819) ccw(c52.642,13.973) 52.797,13.973 52.797,14.314 ccw(c52.463,14.314) IC1_l1.6@52.699,14.55
  Clocks w0.114: v3(26.859,39.662) ccw(c26.859,39.514) 26.711,39.514 26.711,39.085 ccw(c27.093,39.085) 27.093,38.703 28.129,38.703 cw(c28.129,37.946) 28.886,37.946 28.886,37.838 ccw(c29.338,37.838) 29.338,37.386 33.055,37.386 cw(c33.055,35.583) 34.858,35.583 34.858,34.369 ccw(c37.261,34.369) 37.261,31.966 41.414,31.966 cw(c41.414,30.6) 42.38,31.566 42.919,31.027 56.152,17.794 cw(c55.532,17.174) 56.409,17.174 56.409,13.399 cw(c55.462,13.399) 55.462,12.451 53.642,12.451 cw(c53.642,13.297) 52.797,13.297 52.797,13.665 ccw(c52.642,13.665) v3(52.642,13.819)
DMTD_CLK_2_N: C112.2 IC1_l2.7 | length 51.8
  Top Layer w0.099: C112.2@29.426,42.781 cw(c29.524,42.781) 29.524,42.878 29.778,42.878 cw(c29.778,42.73) v3(29.926,42.73) ; IC1_l2.7@53.199,24.786 ccw(c53.435,24.551) 53.101,24.551 53.101,24.209 ccw(c53.256,24.209) v3(53.256,24.055)
  Clocks w0.114: v3(29.926,42.73) cw(c30.075,42.73) 30.075,42.878 31.372,42.878 32.37,42.878 cw(c32.37,42.313) 32.935,42.313 32.935,42.003 ccw(c33.805,42.003) 34.675,42.003 34.675,42.313 cw(c35.241,42.313) 35.241,42.878 35.45,42.878 35.578,42.878 36.004,42.878 cw(c36.004,42.694) 36.188,42.694 36.188,42.197 ccw(c36.372,42.197) 36.556,42.197 36.556,42.694 cw(c36.74,42.694) 36.74,42.878 37.347,42.878 39.246,42.878 cw(c39.246,42.338) 39.628,42.72 41.55,40.798 ccw(c42.307,41.555) 42.307,40.484 46.78,40.484 cw(c46.78,39.804) 47.461,39.804 47.461,36.006 ccw(c48.331,36.006) 48.331,35.135 48.618,35.135 cw(c48.618,34.569) 49.184,34.569 49.184,31.372 ccw(c50.308,31.372) 50.308,30.248 51.017,30.248 55.644,30.247 cw(c55.644,29.897) 55.995,29.897 55.995,23.525 cw(c55.462,23.525) 55.462,22.993 53.642,22.993 cw(c53.642,23.533) 53.101,23.533 53.101,23.901 cw(c53.256,23.901) v3(53.256,24.055)
DMTD_CLK_2_P: C111.2 IC1_l2.6 | length 51.8
  Top Layer w0.099: C111.2@29.426,43.28 ccw(c29.524,43.28) 29.524,43.183 29.778,43.183 ccw(c29.778,43.331) v3(29.926,43.331) ; v3(52.642,24.055) ccw(c52.642,24.209) 52.797,24.209 52.797,24.551 ccw(c52.463,24.551) IC1_l2.6@52.699,24.786
  Clocks w0.114: v3(29.926,43.331) ccw(c30.075,43.331) 30.075,43.183 31.372,43.183 32.37,43.183 cw(c32.37,42.313) 33.24,42.313 33.24,42.003 ccw(c33.805,42.003) 34.371,42.003 34.371,42.313 cw(c35.241,42.313) 35.241,43.183 35.45,43.183 39.246,43.183 cw(c39.246,42.338) 39.843,42.935 41.765,41.013 ccw(c42.307,41.555) 42.307,40.789 46.78,40.789 cw(c46.78,39.804) 47.765,39.804 47.765,36.006 ccw(c48.331,36.006) 48.331,35.44 48.618,35.44 cw(c48.618,34.569) 49.489,34.569 49.489,31.372 ccw(c50.308,31.372) 50.308,30.553 51.143,30.553 ; 51.144,30.552 55.651,30.552 cw(c55.651,29.904) 56.299,29.904 56.299,23.525 cw(c55.462,23.525) 55.462,22.688 53.642,22.688 cw(c53.642,23.533) 52.797,23.533 52.797,23.901 ccw(c52.642,23.901) v3(52.642,24.055)
DMTD_CLK_3_N: C110.2 IC1_l3.7 | length 51.7
  Top Layer w0.099: C110.2@29.426,44.281 cw(c29.524,44.281) 29.524,44.378 29.778,44.378 cw(c29.778,44.23) v3(29.926,44.23) ; IC1_l3.7@53.199,35.023 ccw(c53.435,34.787) 53.101,34.787 53.101,34.446 ccw(c53.256,34.446) v3(53.256,34.292)
  Clocks w0.114: v3(29.926,44.23) cw(c30.075,44.23) 30.075,44.378 32.18,44.378 ccw(c32.18,45.305) 33.107,45.305 33.107,51.511 cw(c33.644,51.511) 33.644,52.049 36.388,52.049 36.814,52.049 cw(c36.814,51.865) 36.998,51.865 36.998,51.37 ccw(c37.182,51.37) 37.366,51.37 37.366,51.865 cw(c37.55,51.865) 37.55,52.049 38.381,52.049 41.516,52.049 cw(c41.516,51.285) 42.056,51.825 42.558,51.323 52.987,40.894 ccw(c53.978,41.885) 53.978,40.484 54.965,40.484 54.966,40.485 55.632,40.485 cw(c55.632,39.919) 56.198,39.919 56.198,33.965 cw(c55.462,33.965) 55.462,33.229 53.642,33.229 cw(c53.642,33.77) 53.101,33.77 53.101,34.138 cw(c53.256,34.138) v3(53.256,34.292)
DMTD_CLK_3_P: C109.2 IC1_l3.6 | length 51.7
  Top Layer w0.099: C109.2@29.426,44.78 ccw(c29.524,44.78) 29.524,44.683 29.778,44.683 ccw(c29.778,44.831) v3(29.926,44.831) ; v3(52.642,34.292) ccw(c52.642,34.446) 52.797,34.446 52.797,34.787 ccw(c52.463,34.787) IC1_l3.6@52.699,35.023
  Clocks w0.114: v3(29.926,44.831) ccw(c30.075,44.831) 30.075,44.683 32.18,44.683 ccw(c32.18,45.305) 32.802,45.305 32.802,51.511 cw(c33.644,51.511) 33.644,52.354 36.515,52.354 41.516,52.354 cw(c41.516,51.286) 42.271,52.041 42.863,51.45 ; 42.863,51.449 53.202,41.11 ccw(c53.979,41.888) 53.979,40.789 54.839,40.789 54.84,40.79 55.632,40.79 cw(c55.632,39.919) 56.503,39.919 56.503,33.965 cw(c55.462,33.965) 55.462,32.924 53.642,32.924 cw(c53.642,33.77) 52.797,33.77 52.797,34.138 ccw(c52.642,34.138) v3(52.642,34.292)
DMTD_CLK_FPGA_N: C120.2 J4.H5 | length 51.9
  Top Layer w0.099: v1(58.324,49.044) cw(c58.473,49.044) 58.473,49.193 61.545,49.193 cw(c61.545,48.71) v3(62.028,48.71)
  Bottom Layer w0.099: v1(24.758,40.162) cw(c24.758,40.014) 24.906,40.014 24.906,39.619 ccw(c26.088,39.619) 26.088,38.437 26.741,38.437 ccw(c26.741,39.827) 28.131,39.827 28.131,40.546 cw(c28.797,40.546) 28.797,41.213 31.497,41.213 ccw(c31.497,42.145) 32.429,42.145 32.429,44.638 cw(c33.167,44.638) 33.167,45.375 41.052,45.375 ccw(c41.052,46.171) 41.848,46.171 41.848,47.143 cw(c42.433,47.143) 42.433,47.728 47.729,47.728 ccw(c47.729,49.025) 49.026,49.025 49.026,51.625 cw(c49.626,51.625) 49.626,52.225 55.006,52.225 cw(c55.006,51.542) 55.689,51.542 55.689,50.33 ccw(c56.827,50.33) 56.827,49.193 57.482,49.193 58.176,49.193 cw(c58.176,49.044) v1(58.324,49.044)
  other v2: 24.758,40.162 58.324,49.044
  other v5: 24.758,40.162 58.324,49.044
DMTD_CLK_FPGA_P: C119.2 J4.H4 | length 51.9
  Top Layer w0.099: v1(58.324,49.646) ccw(c58.473,49.646) 58.473,49.497 61.545,49.497 ccw(c61.545,49.98) v3(62.028,49.98)
  Bottom Layer w0.099: v1(25.359,40.162) ccw(c25.359,40.014) 25.211,40.014 25.211,39.619 ccw(c26.088,39.619) 26.088,38.742 26.741,38.742 ccw(c26.741,39.827) 27.826,39.827 27.826,40.546 cw(c28.797,40.546) 28.797,41.517 31.497,41.517 ccw(c31.497,42.145) 32.125,42.145 32.125,44.638 cw(c33.167,44.638) 33.167,45.68 33.757,45.68 34.207,45.68 ccw(c34.207,45.856) 34.383,45.856 34.383,45.881 cw(c34.56,45.881) 34.736,45.881 34.736,45.856 ccw(c34.913,45.856) 34.913,45.68 35.315,45.68 41.052,45.68 ccw(c41.052,46.171) 41.543,46.171 41.543,47.143 cw(c42.433,47.143) 42.433,48.032 47.729,48.032 ccw(c47.729,49.025) 48.721,49.025 48.721,51.625 cw(c49.626,51.625) 49.626,52.53 55.006,52.53 cw(c55.006,51.542) 55.994,51.542 55.994,50.33 ccw(c56.827,50.33) 56.827,49.497 57.608,49.497 58.176,49.497 ccw(c58.176,49.646) v1(58.324,49.646)
  other v2: 25.359,40.162 58.324,49.646
  other v5: 25.359,40.162 58.324,49.646
EQ0_EN: IC2_l0.5 J4.H10 | length 28.2
  Slow_Ctrl w0.137: v3@36.057,48.603 v3(36.055,48.601) 36.717,48.601 cw(c36.717,48.023) 37.126,48.431 ccw(c38.221,49.527) 38.221,47.978 45.073,47.978 cw(c45.073,45.438) 46.869,47.234 50.59,43.513 ccw(c52.555,45.478) 52.555,42.699 57.765,42.699 cw(c57.765,42.282) 58.059,42.577 ccw(c58.582,43.099) 58.582,42.36 59.345,42.36 ; 59.346,42.36 v3(62.028,42.36)
EQ1_EN: IC2_l1.5 J4.G10 | length 58.2
  Slow_Ctrl w0.137: v3(36.055,17.891) 36.563,17.891 cw(c36.563,17.298) 36.982,17.718 37.025,17.675 ccw(c37.453,18.103) 37.453,17.498 39.345,17.498 ccw(c39.345,19.565) 40.807,18.103 42.442,19.738 cw(c43.506,18.674) 43.506,20.179 67.263,20.179 ccw(c67.263,20.558) 67.642,20.558 67.642,24.786 ccw(c67.223,24.786) 67.223,25.205 64.887,25.205 cw(c64.887,26.177) 63.916,26.177 63.916,41.742 ccw(c63.298,41.742) v3(63.298,42.36)
EQ2_EN: IC2_l2.5 J4.G9 | length 40.3
  Slow_Ctrl w0.137: v3(36.055,28.13) 36.211,28.13 ccw(c36.211,28.757) 36.838,28.757 36.838,29.56 cw(c38.007,29.56) 37.18,30.387 38.856,32.062 cw(c41.131,29.787) 41.131,33.005 43.886,33.005 cw(c43.886,32.169) 44.477,32.76 ccw(c44.925,33.208) 44.925,32.575 45.151,32.575 ccw(c45.151,33.058) 45.493,32.716 45.637,32.86 cw(c46.142,32.355) 46.142,33.069 61.79,33.069 ccw(c61.79,33.961) 62.682,33.961 62.682,43.014 cw(c63.298,43.014) v3(63.298,43.63) v3@63.417,43.51
EQ3_EN: IC2_l3.5 J4.H11 | length 28.6
  Slow_Ctrl w0.137: v3(36.055,38.364) 36.443,38.364 cw(c36.443,37.88) 36.785,38.222 ccw(c37.525,38.962) 37.525,37.916 39.093,37.916 ccw(c39.093,38.263) 39.44,38.263 39.44,39.807 cw(c40.723,39.807) 40.723,41.09 v3(62.028,41.09)
FB_IN_N: C103.1 IC11.61 R66.1 | length 5.2
  Top Layer w0.099: IC11.61@21.236,50.553 21.211,50.578 21.211,50.901 21.211,51.304 cw(c21.387,51.304) 21.387,51.481 21.652,51.481 ccw(c21.652,51.657) 21.652,51.834 21.387,51.834 cw(c21.387,52.01) 21.211,52.01 21.211,52.154 R66.1@21.333,52.277 21.211,52.4 21.211,52.498 cw(c21.513,52.498) 21.513,52.8 22.108,52.8 cw(c22.108,52.503) 22.406,52.503 22.406,52.323 22.406,51.996 C103.1@22.309,51.898
FB_IN_P: C100.1 IC11.62 R66.2 | length 5.2
  Top Layer w0.099: IC11.62@20.881,50.553 20.906,50.578 20.906,51.668 20.906,52.154 R66.2@20.783,52.277 20.906,52.4 20.906,52.498 cw(c21.513,52.498) 21.513,53.105 22.108,53.105 cw(c22.108,52.503) 22.711,52.503 22.711,52.197 22.711,51.996 C100.1@22.808,51.898
FB_OUT_N: C103.2 IC11.59 | length 0.7
  Top Layer w0.099: C103.2@22.309,51.348 22.406,51.251 22.406,50.681 IC11.59@22.381,50.656
FB_OUT_P: C100.2 IC11.58 | length 0.7
  Top Layer w0.099: IC11.58@22.736,50.656 22.711,50.681 22.711,51.251 C100.2@22.808,51.348
FMC_GA0: IC9.2 J4.C34 | length 14
  Top Layer w0.117: IC9.2@60.079,13.238 62.459,13.238 cw(c62.459,12.982) 62.715,12.982 62.715,9.607 ccw(c63.783,9.607) 63.783,8.539 64.612,8.539 ccw(c64.612,11.079) 66.408,9.283 67.934,10.809 ccw(c66.863,11.88) v3(68.378,11.88)
FMC_GA1: IC9.1 J4.D35 | length 12.6
  Top Layer w0.127: IC9.1@60.079,14.518 62.208,14.518 cw(c62.208,13.653) 63.073,13.653 63.073,9.647 ccw(c63.846,9.647) 63.846,8.874 64.597,8.874 ccw(c64.597,10.746) 65.92,9.423 v3(67.108,10.61)
FMC_SCL: IC9.6 J4.C30 R57.1 | length 9.1
  Top Layer w0.117: IC9.6@65.503,11.978 cw(c65.503,13.171) 64.309,13.171 64.309,14.838 cw(c64.653,14.838) 64.653,15.182 R57.1@66.552,15.182 67.308,15.182 ccw(c67.308,15.597) 67.723,15.597 67.723,16.306 cw(c68.378,16.306) v3(68.378,16.96)
FMC_SDA: IC9.5 J4.C31 R58.1 | length 7.2
  Top Layer w0.117: IC9.5@65.503,10.708 ccw(c65.503,12.1) 66.487,11.116 68.015,12.643 ccw(c67.093,13.565) R58.1@68.397,13.565 ccw(c68.397,14.158) 68.99,14.158 68.99,15.392 ccw(c68.692,15.392) 68.692,15.69 v3(68.378,15.69)
FPGA_RX0_C_N: C86.1 J4.C7 | length 40.5
  uStrip2 w0.094: v2(37.423,52.068) 37.447,52.044 37.447,51.645 ccw(c38.618,51.645) 38.618,50.474 38.752,50.474 ccw(c38.752,51.493) 39.472,50.773 40.26,51.561 cw(c40.842,50.979) 40.842,51.801 40.851,51.801 cw(c40.851,50.945) 41.457,51.55 41.839,51.169 ; 41.84,51.169 42.007,51.001 ccw(c42.655,51.649) 42.655,50.732 43.419,50.732 59.011,50.732 cw(c59.011,50.046) 59.698,50.046 59.698,45.29 ccw(c60.863,45.29) 60.863,44.125 63.961,44.125 ccw(c63.961,45.536) 65.372,45.536 65.372,45.718 cw(c66.306,45.718) 66.306,46.653 67.895,46.653 cw(c67.895,46.17) v2(68.378,46.17)
FPGA_RX0_C_P: C85.1 J4.C6 | length 40.5
  uStrip2 w0.094: v2(37.777,52.068) 37.752,52.043 37.752,51.645 ccw(c38.618,51.645) 38.618,50.779 38.629,50.779 ; 38.629,50.779 38.751,50.779 ccw(c38.751,51.497) 39.258,50.989 40.044,51.775 cw(c40.842,50.979) 40.842,52.106 40.854,52.106 cw(c40.854,50.951) 41.671,51.768 41.965,51.473 42.223,51.216 ccw(c42.655,51.649) 42.655,51.037 43.292,51.037 55.126,51.037 55.472,51.037 ccw(c55.472,51.211) 55.646,51.211 55.646,51.239 cw(c55.82,51.239) 55.994,51.239 55.994,51.211 ccw(c56.168,51.211) 56.168,51.037 56.563,51.037 59.011,51.037 cw(c59.011,50.046) 60.003,50.046 60.003,45.29 ccw(c60.863,45.29) 60.863,44.43 63.961,44.43 ccw(c63.961,45.536) 65.067,45.536 65.067,45.718 cw(c66.306,45.718) 66.306,46.957 67.895,46.957 ccw(c67.895,47.44) v2(68.378,47.44)
FPGA_RX0_N: C86.2 IC2_l0.9 | length 0.8
  Bottom Layer w0.099: IC2_l0.9@37.35,50.851 ccw(c37.35,50.948) 37.447,50.948 37.447,51.421 ccw(c37.35,51.421) C86.2@37.35,51.518
FPGA_RX0_P: C85.2 IC2_l0.10 | length 0.8
  Bottom Layer w0.099: IC2_l0.10@37.85,50.851 cw(c37.85,50.948) 37.752,50.948 37.752,51.421 cw(c37.85,51.421) C85.2@37.85,51.518
FPGA_RX1_C_N: C88.1 J4.A3 | length 58
  uStrip2 w0.094: v2(37.423,31.596) 37.447,31.62 37.447,32.56 37.447,33.955 cw(c38.837,33.955) 38.837,35.345 39.331,35.345 ccw(c39.331,36.118) 40.104,36.118 40.104,36.21 cw(c41.555,36.21) 41.555,37.662 47.779,37.662 ccw(c47.779,38.46) 48.578,38.46 48.578,40.546 cw(c49.602,40.546) 49.602,41.57 51.872,41.57 cw(c51.872,40.593) 52.849,40.593 52.849,40.563 ccw(c53.534,40.563) 53.534,39.879 55.091,39.879 55.834,39.879 ccw(c55.834,40.053) 56.008,40.053 56.008,40.081 cw(c56.182,40.081) 56.356,40.081 56.356,40.053 ccw(c56.53,40.053) 56.53,39.879 57.057,39.879 63.346,39.879 cw(c63.346,38.898) 64.327,38.898 64.327,38.745 ccw(c64.927,38.745) 64.927,38.145 69.304,38.145 ccw(c69.304,40.64) 71.798,40.64 71.798,51.339 ccw(c71.4,51.339) 71.4,51.738 ccw(c71.4,51.255) v2(70.918,51.255)
FPGA_RX1_C_P: C87.1 J4.A2 | length 58
  uStrip2 w0.094: v2(37.777,31.596) 37.752,31.62 37.752,32.434 37.752,33.955 cw(c38.837,33.955) 38.837,35.04 39.331,35.04 ccw(c39.331,36.118) 40.409,36.118 40.409,36.21 cw(c41.555,36.21) 41.555,37.357 47.779,37.357 ccw(c47.779,38.46) 48.882,38.46 48.882,40.546 cw(c49.602,40.546) 49.602,41.266 51.872,41.266 cw(c51.872,40.593) 52.544,40.599 52.545,40.529 ccw(c52.639,40.53) 52.545,40.527 ccw(c53.534,40.563) 53.534,39.574 63.346,39.574 cw(c63.346,38.898) 64.022,38.898 64.022,38.745 ccw(c64.927,38.745) 64.927,37.84 69.304,37.84 ccw(c69.304,40.64) 72.103,40.64 72.103,51.339 ccw(c71.4,51.339) 71.4,52.042 cw(c71.4,52.525) v2(70.918,52.525)
FPGA_RX1_N: C88.2 IC2_l2.9 | length 0.8
  Bottom Layer w0.099: IC2_l2.9@37.35,30.378 ccw(c37.35,30.475) 37.447,30.475 37.447,30.948 ccw(c37.35,30.948) C88.2@37.35,31.046
FPGA_RX1_P: C87.2 IC2_l2.10 | length 0.8
  Bottom Layer w0.099: IC2_l2.10@37.85,30.378 cw(c37.85,30.475) 37.752,30.475 37.752,30.948 cw(c37.85,30.948) C87.2@37.85,31.046
FPGA_TX0_C_N: C82.1 IC2_l3.4 | length 0.6
  Bottom Layer w0.099: C82.1@37.35,37.055 IC2_l3.4@37.35,37.614
FPGA_TX0_C_P: C81.1 IC2_l3.1 | length 0.6
  Bottom Layer w0.099: C81.1@38.85,37.055 IC2_l3.1@38.85,37.614
FPGA_TX0_N: C82.2 J4.C3 | length 47.7
  uStrip1 w0.094: v2(37.739,36.666) cw(c37.739,36.457) 37.947,36.457 37.947,36.132 ccw(c39.018,36.132) 39.018,35.061 39.33,35.061 ccw(c39.33,36.089) 40.358,36.089 40.358,36.173 cw(c41.477,36.173) 41.477,37.292 47.587,37.292 ccw(c47.587,38.58) 48.876,38.58 48.876,40.414 cw(c49.681,40.414) 49.681,41.22 51.883,41.22 cw(c51.883,40.339) 52.505,40.962 53.37,40.097 53.459,40.008 ccw(c54.332,40.88) 54.332,39.646 64.123,39.646 ccw(c64.123,41.168) 65.644,41.168 65.644,50.262 cw(c67.115,50.262) 67.115,51.733 67.895,51.733 cw(c67.895,51.25) v5(68.378,51.25)
  other v2: 68.378,51.25
  other v5: 37.739,36.666
FPGA_TX0_P: C81.2 J4.C2 | length 47.6
  uStrip1 w0.094: v5(38.461,36.666) ccw(c38.461,36.457) 38.252,36.457 38.252,36.132 ccw(c39.018,36.132) 39.018,35.366 39.33,35.366 ccw(c39.33,36.089) 40.053,36.089 40.053,36.173 cw(c41.477,36.173) 41.477,37.597 47.587,37.597 ccw(c47.587,38.58) 48.571,38.58 48.571,40.414 cw(c49.681,40.414) 49.681,41.524 51.884,41.524 cw(c51.884,40.343) 52.72,41.178 53.496,40.402 53.675,40.223 ccw(c54.332,40.88) 54.332,39.951 55.823,39.951 55.87,39.951 ccw(c55.87,40.125) 56.044,40.125 56.044,40.153 cw(c56.218,40.153) 56.392,40.153 56.392,40.125 ccw(c56.566,40.125) 56.566,39.951 57.774,39.951 64.123,39.951 ccw(c64.123,41.168) 65.339,41.168 65.339,50.262 cw(c67.115,50.262) 67.115,52.037 67.895,52.037 ccw(c67.895,52.52) v2(68.378,52.52)
  other v2: 38.461,36.666
  other v5: 68.378,52.52
FPGA_TX1_C_N: C84.1 U6.2 | length 0.9
  Top Layer w0.099: U6.2@50.609,8.665 ccw(c50.681,8.665) 50.681,8.592 C84.1@51.477,8.592
FPGA_TX1_C_P: C83.1 U6.1 | length 0.9
  Top Layer w0.099: U6.1@50.609,8.165 cw(c50.681,8.165) 50.681,8.238 C83.1@51.477,8.238
FPGA_TX1_N: C84.2 J4.A23 | length 37.5
  uStrip1 w0.094: v1(52.027,8.665) ccw(c52.124,8.665) 52.124,8.567 60.685,8.567 ccw(c60.685,10.104) 62.222,10.104 62.222,17.251 cw(c63.755,17.251) 63.755,18.784 64.677,18.784 64.724,18.784 ccw(c64.724,18.958) 64.898,18.958 64.898,19.225 cw(c65.072,19.225) 65.246,19.225 65.246,18.958 ccw(c65.42,18.958) 65.42,18.784 66.558,18.784 66.644,18.784 69.464,18.784 ccw(c69.464,21.324) 72.004,21.324 72.004,25.832 ccw(c71.503,25.832) 71.503,26.333 71.4,26.333 ccw(c71.4,25.85) v5(70.918,25.85)
  other v2: 70.918,25.85